# Altium PCB adau1979-fpga.PcbDoc (part 9 of 10)
Units mil, origin at the board's own origin, x right, y up, seen from the top; angles counter-clockwise.
Board outline 7874.02 x 9055.12 mil, 4 copper layers (Top Layer, GND, POWER, Bottom Layer), stack 23.756 mil thick; 636 components, 457 nets, 2015 pads, 4184 vias.
Unrouted connection lines stored in the file: 10.
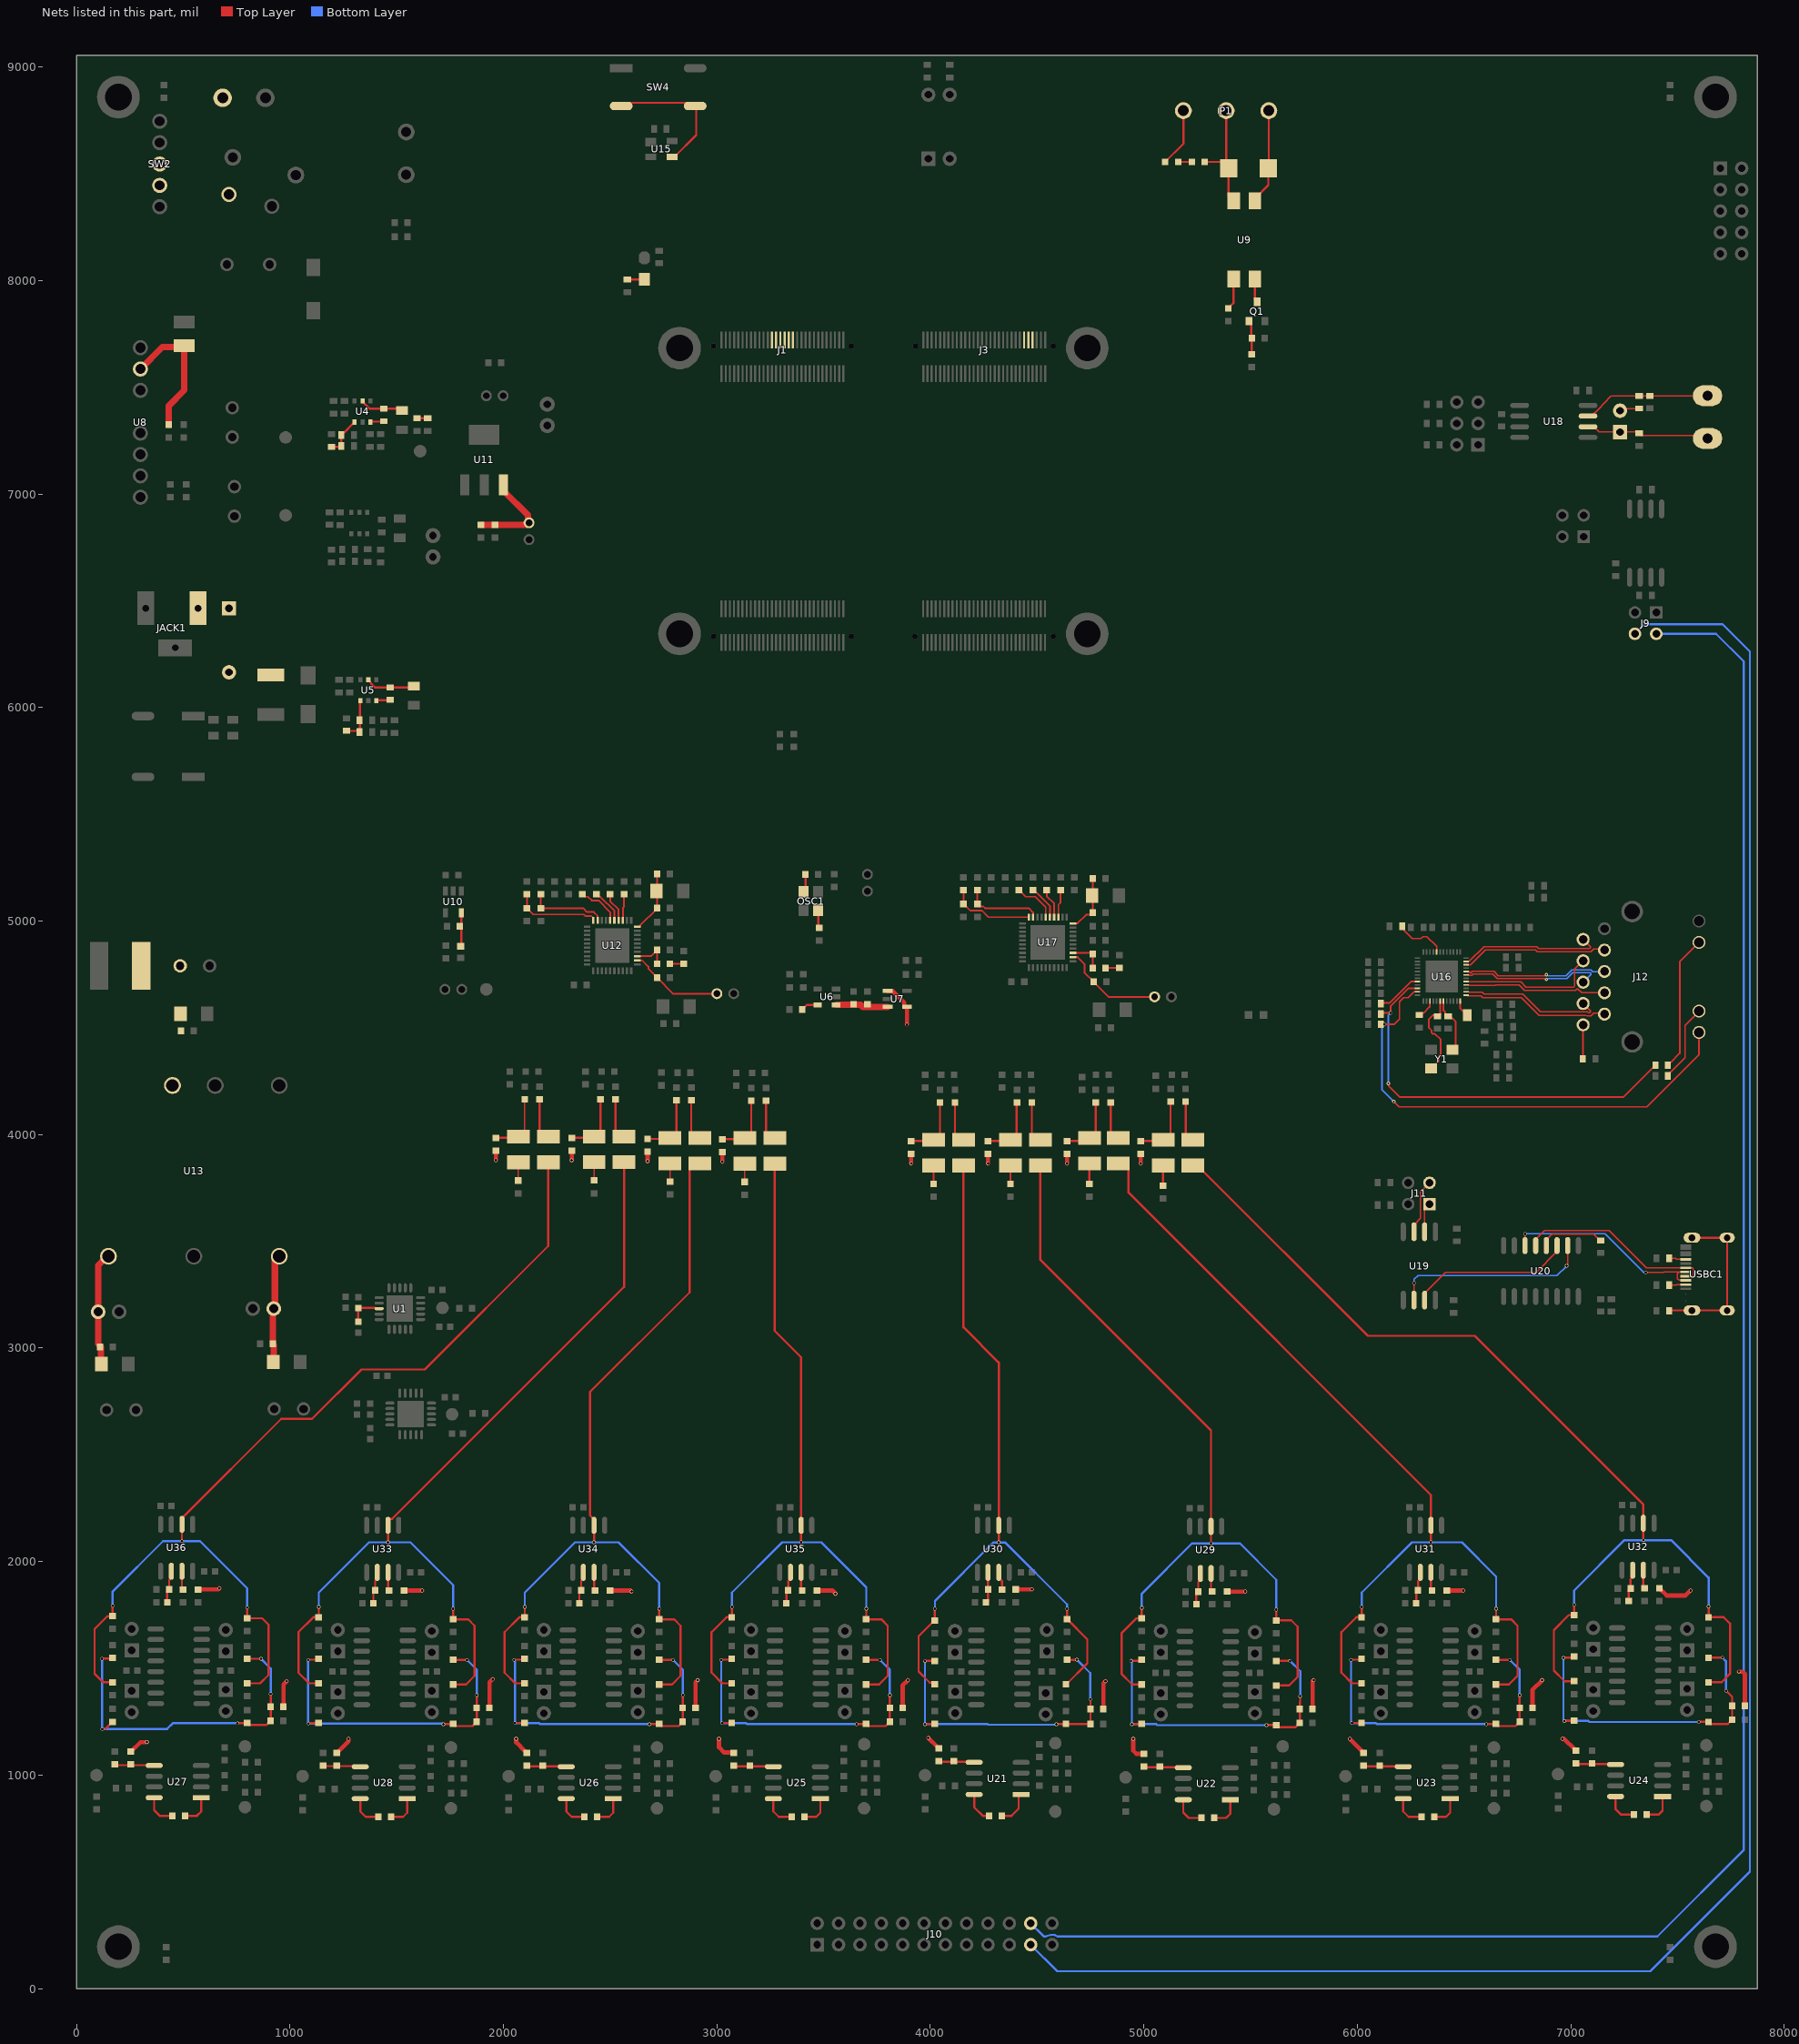
[diagram p8: the nets of this part, all layers, seen from the top]

## Via types
v1: diameter 50, hole 28, Top Layer to Bottom Layer, 3377 vias
v2: diameter 16, hole 12, Top Layer to Bottom Layer, 784 vias
v3: diameter 20, hole 12, Top Layer to Bottom Layer, 14 vias
v4: diameter 16, hole 8, Top Layer to Bottom Layer, 9 vias

## Nets (pads, with @x,y where several pads share a name; then routed paths per layer and width w, separated by ;. In a path a pad name is that pad's centre, name@x,y a point inside that pad or via, vN(x,y) a via of type N, cw(c..) or ccw(c..) an arc to the next point about the centre after c; other vN are vias at no path point) (continued)
NetC18_1: C18.1 L2.1 U4.2 | length 204.6
  Top Layer w10: U4.2@1340,7435 1340,7433.03 1373.03,7400 C18.1@1440,7400 1515.47,7400 L2.1@1525,7390.47
NetC18_2: C18.2 U4.6 | length 64.4
  Top Layer w10: U4.6@1377.4,7336.57 1379.59,7338.76 1437.82,7338.76 C18.2@1440,7340.94
NetC19_1: C19.1 L3.1 U5.2 | length 232.8
  Top Layer w10: U5.2@1367.4,6130 1367.4,6128.03 1379.96,6115.47 1379.96,6111.98 1397.41,6094.53 C19.1@1470,6094.53 1574.53,6094.53 L3.1@1580,6100
NetC19_2: C19.2 U5.6 | length 66.8
  Top Layer w10: U5.6@1404.8,6031.57 1406.75,6033.52 1468.05,6033.52 C19.2@1470,6035.47
NetC28_2: C28.2 R14.2 R17.2 U4.4 | length 184.3
  Top Layer w10: R17.2@1195,7220.94 1235.95,7220.94 C28.2@1240.47,7225.47 R14.2@1240.47,7275.47 ; R14.2@1240.47,7279.41 1249.25,7288.19 1254.21,7288.19 1295.79,7329.76 1297.76,7329.76 1302.6,7334.61 U4.4@1302.6,7336.57
NetC29_2: C29.2 R15.2 R18.2 U5.4 | length 200.8
  Top Layer w10: R18.2@1265,5890.47 1320.94,5890.47 1325.47,5895 1327.74,5897.26 1327.74,6029.31 U5.4@1330,6031.57
NetC30_1: C30.1 U6.5 | length 81.6
  Top Layer w10: C30.1@3399.92,4585 3399.92,4585.79 3421.73,4607.6 U6.5@3471.69,4607.6
NetC37_1: C37.1 L4.2 U8.2 | length 650.5
  Top Layer w30: U8.2@300,7585 402.94,7687.94 498.06,7687.94 L4.2@505,7694.88 505,7485 432.5,7412.5 C37.1@432.5,7324.92
NetC39_2: C39.2 L5.1 U10.5 | length 157.3
  Top Layer w10: L5.1@1800,4882.6 1802.4,4885 U10.5@1802.4,5038.9
NetC51_1: C51.1 R31.2 R32.1 | length 295.2
  Top Layer w6: C51.1@2065.18,3984.92 2066,3984.92 2100,4018.93 R32.1@2100,4165.08
  Top Layer w10: R31.2@1965,3984.92 C51.1@2065.18,3984.92
NetC51_2: C51.2 R28.2 | length 85.3
  Top Layer w6: R28.2@2070,3784.92 C51.2@2070,3870.26
NetC56_1: C56.1 C57.1 R27.2 U11.3 | length 456.7
  Top Layer w30: R27.2@1895,6854.92 2104.19,6854.92 2114.27,6865 C56.1@2120,6865 2115.95,6869.05 2115.95,6900.12 2000.55,7015.51 U11.3@2000.55,7043.07
NetC58_2: C58.2 R33.1 | length 199.4
  Top Layer w10: R33.1@2170,4165.08 2170,4016.93 2197.19,3989.74 C58.2@2210,3989.74
NetC60_2: C60.2 C61.1 L7.1 U13.6 | length 501.2
  Top Layer w30: L7.1@923.99,2936.69 923.99,3015.22 919.92,3019.29 C61.1@919.92,3020 919.92,3180.71 C60.2@924.21,3185 929.61,3190.39 929.61,3424.6 U13.6@935,3430
NetC64_1: C64.1 R38.2 R39.1 | length 293.6
  Top Layer w10: R38.2@2320,3985 2420.18,3985 C64.1@2425,3989.82 ; C64.1@2427.81,3989.82 2455,4017 R39.1@2455,4165.16
NetC64_2: C64.2 R34.2 | length 85.3
  Top Layer w6: R34.2@2425,3785 C64.2@2425,3870.34
NetC65_1: C65.1 C68.2 L9.1 U13.4 | length 525.4
  Top Layer w30: C65.1@101.57,3170 101.57,3388.06 135,3421.48 U13.4@135,3430 ; C65.1@101.57,3170 101.58,3019.21 115.08,3005.71 115.08,3005 115.12,3004.96 115.12,2927.18 L9.1@117.3,2925
NetC69_1: C69.1 C71.1 C72.2 L8.2 U13.3
NetC73_1: C73.1 R43.1 | length 199.4
  Top Layer w10: R43.1@2525,4165.16 2525,4017 2552.18,3989.82 C73.1@2565,3989.82
NetC76_1: C76.1 R51.2 R52.1 | length 293.6
  Top Layer w10: R51.2@2675,3979.92 2775.18,3979.92 C76.1@2780,3984.74 ; C76.1@2782.82,3984.74 2810,4011.93 R52.1@2810,4160.08
NetC76_2: C76.2 R48.2 | length 85.3
  Top Layer w6: R48.2@2780,3779.92 C76.2@2780,3865.26
NetC79_1: C79.1 R55.1 | length 199.4
  Top Layer w10: R55.1@2880,4160.08 2880,4011.93 2907.19,3984.74 C79.1@2920,3984.74
NetC83_1: C83.1 R64.2 R65.1 | length 293.6
  Top Layer w10: R64.2@3025.74,3978.54 3125.92,3978.54 C83.1@3130.74,3983.36 ; C83.1@3133.55,3983.36 3160.74,4010.55 R65.1@3160.74,4158.7
NetC83_2: C83.2 R58.2 | length 85.3
  Top Layer w6: R58.2@3130.74,3778.54 C83.2@3130.74,3863.88
NetC87_1: C87.1 C88.1 U12.2 | length 442.4
  Top Layer w8: U12.2@2628.1,4816.1 2628.2,4816 2649.65,4816 2679.38,4786.27 2679.38,4776.48 2720.08,4735.79 C87.1@2720.08,4735 ; C87.1@2720.08,4734.21 2794.29,4660 C88.1@3000,4660
NetC90_2: C90.2 C96.2 R69.2 U12.10 | length 290.5
  Top Layer w8: U12.10@2628.1,4973.6 2638.35,4973.6 2639.85,4975.1 2639.85,4978.98 2720.08,5059.21 C90.2@2720.08,5060 R69.2@2720.08,5220
NetC95_1: C95.1 C99.1 U12.3 | length 169.6
  Top Layer w8: U12.3@2628.1,4835.8 2691.67,4835.8 2720.08,4864.21 C99.1@2720.08,4865 2720.16,4864.92 C95.1@2720.16,4800
NetC95_2: C95.2 R68.1 | length 65
  Top Layer w8: C95.2@2780,4800 2844.92,4800 R68.1@2845,4800.08
NetC97_1: C97.1 R67.1 | length 199.4
  Top Layer w10: R67.1@3230.74,4158.7 3230.74,4010.55 3257.92,3983.36 C97.1@3270.74,3983.36
NetC101_1: C101.1 R72.2 R73.1 | length 296.4
  Top Layer w10: R72.2@3910,3969.92 4010.18,3969.92 C101.1@4015,3974.74 4017.82,3974.74 4045,4001.93 R73.1@4045,4150.08
NetC101_2: C101.2 R70.2 | length 85.3
  Top Layer w10: R70.2@4015,3769.92 C101.2@4015,3855.26
NetC107_1: C107.1 R76.1 | length 199.4
  Top Layer w10: R76.1@4115,4150.08 4115,4001.93 4142.19,3974.74 C107.1@4155,3974.74
NetC109_1: C109.1 R87.2 R88.1 | length 295.6
  Top Layer w10: R87.2@4270,3969.92 4370.18,3969.92 C109.1@4375,3974.74 4377.03,3974.74 4404.21,4001.93 R88.1@4404.21,4150.08
NetC109_2: C109.2 R80.2 | length 85.3
  Top Layer w10: R80.2@4375,3769.92 C109.2@4375,3855.26
NetC114_1: C114.1 R92.1 | length 199.4
  Top Layer w10: R92.1@4475,4150.08 4475,4001.93 4502.19,3974.74 C114.1@4515,3974.74
NetC117_1: C117.1 R104.2 R105.1 | length 286.9
  Top Layer w10: R104.2@4640.79,3969.92 4730.18,3969.92 C117.1@4745,3984.74 ; C117.1@4747.82,3984.74 4775,4011.93 R105.1@4775,4150.08
NetC117_2: C117.2 R98.2 | length 95.3
  Top Layer w10: R98.2@4745,3769.92 C117.2@4745,3865.26
NetC122_1: C122.1 R107.1 | length 184.4
  Top Layer w10: R107.1@4845,4150.08 4845,4011.93 4872.19,3984.74 C122.1@4880,3984.74
NetC124_1: C124.1 R112.2 R113.1 | length 306.4
  Top Layer w10: R112.2@4985,3969.92 5085.1,3969.92 C124.1@5090,3974.82 5097.82,3974.82 5125,4002 R113.1@5125,4155.08
NetC124_2: C124.2 R108.2 | length 95.4
  Top Layer w10: R108.2@5090,3759.92 C124.2@5090,3855.34
NetC125_2: C125.2 C135.2 R123.2 U17.10 | length 273.3
  Top Layer w8: U17.10@4668.1,4988.6 4668.96,4989.46 4689.46,4989.46 4729.2,5029.2 4749.28,5029.2 C125.2@4760.08,5040 4760.08,5120 R123.2@4760.08,5200
NetC126_1: C126.1 C131.1 U17.2 | length 483.2
  Top Layer w8: U17.2@4668.1,4831.1 4668.2,4831 4689.65,4831 4721.88,4798.77 4721.88,4758.98 4765.08,4715.79 C126.1@4765.08,4715 4765.08,4714.21 4834.29,4645 C131.1@5050,4645
NetC127_2: C127.2 J12.1 | length 159.6
  Top Layer w8: C127.2@7055.47,4355 7057.09,4356.61 J12.1@7057.09,4513.98
NetC128_2: C128.2 U20.4 | length 305.1
  Top Layer w6: U20.4@6885,3480 6885,3508 6910,3533 7107.59,3533 7136.06,3504.53 C128.2@7140,3504.53
NetC132_2: C132.2 U16.42 Y1.3 | length 397.2
  Top Layer w8: Y1.3@6345,4310 6348.94,4310 6369.56,4330.62 6369.56,4334.56 6381.56,4346.56 6381.56,4367.85 6390,4376.29 6390,4445 6363.31,4471.69 6353.14,4471.69 6347.28,4477.55 6347.28,4487.72 6335,4500 6335,4540.27 6354.47,4559.75 C132.2@6365.52,4559.75 ; C132.2@6375,4554.53 6378.22,4554.53 6388,4564.31 6388,4607.46 6387.13,4608.33 U16.42@6387.13,4625.53
NetC133_2: C133.2 U16.43 Y1.1 | length 269.9
  Top Layer w8: U16.43@6402.87,4625.53 6402.87,4580.59 6411.28,4572.18 6411.28,4564.31 6417.44,4558.15 C133.2@6425.32,4558.15 ; C133.2@6425,4554.53 6435.47,4554.53 6435.47,4547.99 6438.72,4544.75 6445.25,4544.75 6460,4530 6460,4411.61 Y1.1@6445,4396.61
NetC134_1: C134.1 C136.1 U17.3 | length 159.4
  Top Layer w8: U17.3@4668.1,4850.8 4754.28,4850.8 C136.1@4760.08,4845 4760.08,4780.08 C134.1@4760.16,4780
NetC134_2: C134.2 R119.1 | length 65
  Top Layer w8: C134.2@4820,4780 4884.92,4780 R119.1@4885,4780.08
NetC137_1: C137.1 R122.1 | length 198.5
  Top Layer w10: R122.1@5195.79,4155.08 5195.79,4002 5222.97,3974.82 C137.1@5230,3974.82
NetC172_1: C172.1 R229.1 U29.2 | length 152
  Top Layer w10: C172.1@5245.59,1800 5245.59,1851.26 R229.1@5254.33,1860 ; R229.1@5254.33,1860.78 5254.33,1904.14 5264.41,1914.22 U29.2@5264.41,1945
NetC173_1: C173.1 R231.1 U30.2 | length 141.6
  Top Layer w10: C173.1@4266.18,1810 4270,1813.82 4270,1870 U30.2@4270,1950
NetC174_1: C174.1 R238.1 U31.2 | length 152
  Top Layer w10: C174.1@6275.59,1805 6275.59,1856.26 R238.1@6284.33,1865 ; R238.1@6284.33,1865.78 6284.33,1909.14 6294.41,1919.22 U31.2@6294.41,1950
NetC175_1: C175.1 R239.1 U32.2 | length 152
  Top Layer w10: C175.1@7270.59,1815 7270.59,1866.26 R239.1@7279.33,1875 ; R239.1@7279.33,1875.78 7279.33,1919.14 7289.41,1929.22 U32.2@7289.41,1960
NetC176_1: C176.1 R240.1 U33.2 | length 152
  Top Layer w10: C176.1@1390.59,1805 1390.59,1856.26 R240.1@1399.33,1865 ; R240.1@1399.33,1865.78 1399.33,1909.14 1409.41,1919.22 U33.2@1409.41,1950
NetC177_1: C177.1 R241.1 U34.2 | length 152
  Top Layer w10: C177.1@2355.59,1805 2355.59,1856.26 R241.1@2364.33,1865 ; R241.1@2364.33,1865.78 2364.33,1909.14 2374.41,1919.22 U34.2@2374.41,1950
NetC178_1: C178.1 R242.1 U35.2 | length 152
  Top Layer w10: C178.1@3325.59,1805 3325.59,1856.26 R242.1@3334.33,1865 ; R242.1@3334.33,1865.78 3334.33,1909.14 3344.41,1919.22 U35.2@3344.41,1950
NetC179_1: C179.1 R245.1 U36.2 | length 152
  Top Layer w10: C179.1@425.59,1810 425.59,1861.26 R245.1@434.33,1870 ; R245.1@434.33,1870.78 434.33,1914.14 444.41,1924.22 U36.2@444.41,1955
NetCON1_1: CON1.1 J13.1 R77.1 U18.6 | length 582.8
  Top Layer w6: U18.6@7080,7315 7107.13,7315 7132.13,7290 7314.53,7290 R77.1@7320,7284.53 7330.78,7273.75 7626.25,7273.75 CON1.1@7640,7260
NetCON1_2: CON1.2 R84.2 R106.1 U18.7 | length 599.4
  Top Layer w6: U18.7@7080,7365 7095,7365 7129.02,7396.69 ccw(c7112,7415) 7130.03,7397.69 7186.49,7456.49 7190,7460 7320,7460 R106.1@7370,7460 CON1.2@7640,7460
NetF1_1: F1.1 SW1.2
NetF2_1: F2.1 SW2.3
NetJ9_2: J9.2 J10.22 | length 9564.4
  Bottom Layer w10: J10.22@4470,306 4528.07,247.93 4531,245 4539.28,245 4555.85,250.29 cw(c4570,206) 4595.32,245 7405,245 7810,650 7810,6215 7680,6345 J9.2@7400,6345
NetJ9_4: J9.4 J10.21 | length 9935.8
  Bottom Layer w10: J10.21@4470,206 4594.15,81.85 7371.85,81.85 7838,548 7838,6262 7710.47,6389.53 7344.53,6389.53 J9.4@7300,6345
NetJ12_12: J12.12 R93.2 | length 363.6
  Top Layer w8: R93.2@7454.53,4275 7454.53,4278.94 7535,4359.41 7535,4512.01 7600,4577.01 J12.12@7600,4578.35
NetJ12_13: J12.13 R101.2 | length 637.6
  Top Layer w8: R101.2@7454.53,4325 7454.53,4328.94 7464.31,4338.72 7468.24,4338.72 7510,4380.47 7510,4810 J12.13@7600,4900
NetJ13_2: J13.2 R84.1 | length 94.3
  Top Layer w6: J13.2@7230,7390 7240.47,7400.47 R84.1@7320,7400.47
NetJACK1_1: JACK1.1 SW1.1
NetL10_1: L10.1 U16.48 | length 75.2
  Top Layer w8: U16.48@6481.61,4625.53 6481.61,4590.89 6505,4567.5 L10.1@6505,4560
NetLED1_1: LED1.1 R13.1 | length 50
  Top Layer w10: R13.1@1595,7355 LED1.1@1645,7355
NetLED2_1: LED2.1 R46.2 | length 80.2
  Top Layer w10: R46.2@2580,8004.53 2659.53,8004.53 LED2.1@2660,8005
NetOSC1_1: OSC1.1 R26.1 | length 85.7
  Top Layer w10: OSC1.1@3405.5,5137.04 3415.08,5146.62 R26.1@3415.08,5218.74
NetOSC1_3: OSC1.3 R30.1 | length 84.1
  Top Layer w10: OSC1.3@3474.4,5050.44 3474.4,4974.26 R30.1@3480,4968.66
NetP2_2: P2.2 SW2.2
NetQ1_1: Q1.1 R21.2 R22.2 | length 159.9
  Top Layer w10: Q1.1@5492.6,7809.73 5503.35,7798.98 5503.35,7730.79 5505,7729.13 R21.2@5505,7654.92
NetQ1_3: Q1.3 U9.2 | length 110.8
  Top Layer w10: U9.2@5520,8006.93 5520,7910.27 Q1.3@5530,7900.27
NetR2_1: R2.1 R4.2 U1.3 | length 162.8
  Top Layer w10: R4.2@1320,3123.46 R2.1@1320,3187.28 ; R2.1@1320,3187.89 1399.53,3187.89 1402.42,3185 U1.3@1417.82,3185
NetR16_2: R16.2 R20.1 | length 65.2
  Top Layer w10: R16.2@5159.92,8555 R20.1@5225.08,8555
NetR19_2: R19.2 U9.1 | length 147.8
  Top Layer w10: R19.2@5395,7869.92 5395.79,7869.92 5420,7894.13 U9.1@5420,8006.93
NetR36_2: R36.2 R53.1 U12.20 | length 405.3
  Top Layer w8: R53.1@2110,5059.92 R36.2@2110,5125.08 ; R53.1@2110.79,5059.92 2139.75,5030.96 2376.79,5030.96 2383.63,5024.12 2410.73,5024.12 2419.9,5014.95 2419.9,5004.7 U12.20@2421.4,5003.2
NetR37_2: R37.2 R54.2 U12.19 | length 367.3
  Top Layer w8: R37.2@2175,5125.08 R54.2@2175,5059.92 2373.28,5059.92 2391.09,5042.12 2423.53,5042.12 2440.9,5024.75 2440.9,5003.4 U12.19@2441.1,5003.2
NetR42_1: R42.1 U12.16 | length 203.4
  Top Layer w8: R42.1@2370,5125.08 2380.96,5114.12 2395.45,5114.12 2413.45,5096.12 2445.9,5096.12 2500.3,5041.72 2500.3,5003.4 U12.16@2500.1,5003.2
NetR44_1: R44.1 U12.15 | length 161.3
  Top Layer w8: R44.1@2435,5125.08 2445.96,5114.12 2453.35,5114.12 2519.8,5047.67 U12.15@2519.8,5003.2
NetR47_1: R47.1 U12.14 | length 138.2
  Top Layer w8: R47.1@2500,5125.08 2500,5092.93 2539.5,5053.43 U12.14@2539.5,5003.2
NetR49_1: R49.1 U12.13 | length 124.2
  Top Layer w8: U12.13@2559.2,5003.2 2559.4,5003.4 2559.4,5061.69 2565,5067.29 R49.1@2565,5125
NetR78_2: R78.2 R102.1 U17.20 | length 396.3
  Top Layer w8: R102.1@4155,5079.92 R78.2@4155,5145.08 ; R102.1@4155.79,5079.92 4186.67,5049.04 4241.55,5049.04 4272.39,5018.2 U17.20@4461.4,5018.2
NetR79_2: R79.2 R103.2 U17.19 | length 363.5
  Top Layer w8: R103.2@4220,5079.92 R79.2@4220,5145.08 ; R103.2@4220.79,5079.92 4231.75,5068.96 4247.08,5068.96 4256.04,5060 4460.65,5060 4480.9,5039.75 4480.9,5018.4 U17.19@4481.1,5018.2
NetR89_1: R89.1 U17.16 | length 205.5
  Top Layer w8: R89.1@4415,5145.08 4415.79,5145.08 4446.87,5114 4491.91,5114 4540,5065.91 4540,5018.3 U17.16@4540.1,5018.2
NetR91_1: R91.1 U17.15 | length 163.6
  Top Layer w8: R91.1@4480,5145.08 4480.79,5145.08 4491.75,5134.12 4497.25,5134.12 4559.8,5071.57 U17.15@4559.8,5018.2
NetR94_1: R94.1 U17.14 | length 141.2
  Top Layer w8: R94.1@4545,5145.08 4545,5116.65 4579.5,5082.15 U17.14@4579.5,5018.2
NetR95_2: R95.2 USBC1.1 USBC1.2 USBC1.3 USBC1.4 | length 778.1
  Top Layer w10: R95.2@7459.53,3175 7461.02,3176.49 USBC1.3@7731.85,3176.49 USBC1.2@7731.85,3517.05 USBC1.1@7567.29,3517.05
NetR96_1: R96.1 U16.20 | length 236.3
  Top Layer w6: R96.1@6209.53,4970 6209.53,4966.06 6227.17,4948.43 6227.17,4948.14 6257.31,4918 6297.98,4918 6307.54,4927.56 6325.87,4927.56 6371.38,4882.05 U16.20@6371.38,4854.47
NetR97_1: R97.1 U17.13 | length 131.3
  Top Layer w8: U17.13@4599.2,5018.2 4599.4,5018.4 4599.4,5076.69 4610,5087.29 R97.1@4610,5145
NetR110_1: R110.1 U16.39 | length 78.4
  Top Layer w8: R110.1@6300,4569.53 6309.98,4569.53 6338,4597.54 6338,4603.25 6339.82,4605.07 6339.82,4625.47 U16.39@6339.88,4625.53
NetR114_1: R114.1 U16.32 | length 213.7
  Top Layer w8: R114.1@6109.53,4613.33 6113.46,4617.27 6152.22,4617.27 6251.33,4716.38 U16.32@6280.53,4716.38
NetR120_1: R120.1 USBC1.A5 | length 78.6
  Top Layer w6: R120.1@7459.53,3295 7491.49,3295 7494.05,3297.56 USBC1.A5@7537.04,3297.56
NetR121_1: R121.1 USBC1.B5 | length 79.3
  Top Layer w6: R121.1@7459.53,3420 7490.61,3420 7494.94,3415.67 USBC1.B5@7537.04,3415.67
NetR133_2: R133.2 R135.2 U21.5 | length 167.1
  Top Layer w10: R135.2@4040,1065.08 4042.54,1062.54 4202.46,1062.54 U21.5@4205,1060
NetR136_2: R136.2 R139.2 U22.5 | length 187.1
  Top Layer w10: R139.2@4999.41,1040.08 5002.76,1036.72 5182.68,1036.72 U22.5@5184.41,1035
NetR137_2: R137.2 R141.2 U23.5 | length 187.1
  Top Layer w10: R141.2@6029.41,1045.08 6032.76,1041.72 6212.68,1041.72 U23.5@6214.41,1040
NetR142_2: R142.2 R150.2 U24.5 | length 187.1
  Top Layer w10: R150.2@7024.41,1055.08 7027.76,1051.72 7207.68,1051.72 U24.5@7209.41,1050
NetR143_2: R143.2 R148.2 U26.5 | length 187.1
  Top Layer w10: R148.2@2109.41,1045.08 2112.76,1041.72 2292.68,1041.72 U26.5@2294.41,1040
NetR144_2: R144.2 R152.2 U25.5 | length 187.1
  Top Layer w10: R152.2@3079.41,1045.08 3082.76,1041.72 3262.68,1041.72 U25.5@3264.41,1040
NetR146_2: R146.2 R154.2 U28.5 | length 176.5
  Top Layer w10: R146.2@1155,1045.08 1157.54,1042.54 1326.87,1042.54 U28.5@1329.41,1040
NetR151_2: R151.2 R155.2 U27.5 | length 187.1
  Top Layer w10: R155.2@179.41,1050.08 182.76,1046.72 362.68,1046.72 U27.5@364.41,1045
NetR157_1: R157.1 R173.1 R187.1 R193.1 R206.1 R218.2 | length 1580
  Top Layer w10: v2(4940,1535) 4941.15,1536.15 4985.48,1536.15 R173.1@4989.41,1540.08 ; v2@4945.08,1240.08 R157.1@4989.41,1240.08 ; v2@5575.08,1235.08 R187.1@5619.41,1235.08 5629.37,1225.11 5635.9,1225.11 5636.01,1225 5710.08,1225 5719.33,1234.25 5720.12,1234.25 5730.08,1244.21 R193.1@5730.08,1310 5730.04,1310.04 5730.04,1342 5732,1343.96 v2(5732,1370) ; R206.1@5619.41,1535.15 v2(5684.25,1535.15)
  Bottom Layer w10: v2(4940,1535) 4940,1540 4943.93,1536.07 v2(4943.93,1238.93) 5056.94,1238.93 5061.94,1233.93 v2(5573.93,1233.93) ; v2(5684.25,1535.15) 5733,1486.4 5733,1371 v2(5732,1370)
NetR159_1: R159.1 R175.1 R191.1 R204.1 R214.1 R228.2 | length 1530.8
  Top Layer w10: v2@3975.67,1240.08 R159.1@4020,1240.08 ; v2@3975.67,1535.08 R175.1@4020,1535.08 ; v2@4590.67,1240.08 R191.1@4635,1240.08 4750,1240.08 R228.2@4750.08,1240 R204.1@4750.08,1310 v2@4750.08,1354.33 ; R214.1@4640,1540.08 v2@4684.33,1540.08
  Bottom Layer w10: v2(3974.52,1533.93) v2(3974.52,1238.93) 4266.91,1238.93 4269.31,1236.54 4585.5,1236.54 4587.9,1238.93 v2(4589.52,1238.93) ; v2(4685.48,1541.23) 4748.93,1477.78 v2(4748.93,1355.48)
NetR161_1: R161.1 R177.1 R194.1 R205.1 R216.1 R230.2 | length 1567.5
  Top Layer w10: v2(5970,1540) 5971.15,1541.15 6015.48,1541.15 R177.1@6019.41,1545.08 ; v2@5975.08,1245.08 R161.1@6019.41,1245.08 ; v2@6605.08,1240.08 R194.1@6649.41,1240.08 6659.37,1230.11 6665.9,1230.11 6666.01,1230 6740.08,1230 6749.33,1239.25 6750.12,1239.25 6760.08,1249.21 R205.1@6760.08,1315 6760.04,1315.04 v2(6760,1375) v2(6760,1375) ; R216.1@6649.41,1540.15 v2(6714.25,1540.15)
  Bottom Layer w10: v2(5970,1540) 5970,1249.48 5973.93,1245.55 v2(5973.93,1243.93) 6086.94,1243.93 6091.94,1238.93 v2(6603.93,1238.93) ; v2(6714.25,1540.15) 6760,1494.4 v2(6760,1375)
NetR163_1: R163.1 R179.1 R196.1 R208.2 R219.1 R232.2 | length 1567.5
  Top Layer w10: v2(6965,1550) 6966.15,1551.15 7010.48,1551.15 R179.1@7014.41,1555.08 ; v2@6970.08,1255.08 R163.1@7014.41,1255.08 ; v2@7600.08,1250.08 R196.1@7644.41,1250.08 7654.37,1240.11 7660.9,1240.11 7661.01,1240 7735.08,1240 7744.33,1249.25 7745.12,1249.25 7755.08,1259.21 R208.2@7755.08,1325 7755.04,1325.04 7755.04,1367 v2(7727,1395) ; R219.1@7644.41,1550.15 v2(7709.25,1550.15)
  Bottom Layer w10: v2(6965,1550) 6965,1259.48 6968.93,1255.55 v2(6968.93,1253.93) 7081.94,1253.93 7086.94,1248.93 v2(7598.93,1248.93) ; v2(7709.25,1550.15) 7727,1532.4 v2(7727,1395)
NetR165_1: R165.1 R181.1 R198.1 R211.1 R222.1 R235.2 | length 1569.8
  Top Layer w10: v2(1085,1540) 1086.15,1541.15 1130.48,1541.15 R181.1@1134.41,1545.08 ; v2@1088.11,1243.11 R165.1@1132.44,1243.11 ; v2@1720.08,1240.08 R198.1@1764.41,1240.08 1774.37,1230.11 1780.9,1230.11 1781.01,1230 1855.08,1230 1864.33,1239.25 1865.12,1239.25 1875.08,1249.21 R211.1@1875.08,1315 1875.04,1315.04 v2(1875,1375) v2(1875,1375) ; R222.1@1764.41,1540.15 v2(1829.25,1540.15)
  Bottom Layer w10: v2(1085,1540) 1085,1245.55 1086.96,1243.59 v2(1086.96,1241.96) 1087.4,1241.53 1714.7,1241.53 1717.3,1238.93 v2(1718.93,1238.93) ; v2(1829.25,1540.15) 1875,1494.4 v2(1875,1375)
NetR167_1: R167.1 R183.1 R200.1 R212.1 R224.1 R236.2 | length 1567.5
  Top Layer w10: v2(2050,1540) 2051.15,1541.15 2095.48,1541.15 R183.1@2099.41,1545.08 ; v2@2055.08,1245.08 R167.1@2099.41,1245.08 ; v2@2685.08,1240.08 R200.1@2729.41,1240.08 2739.37,1230.11 2745.9,1230.11 2746.01,1230 2820.08,1230 2829.33,1239.25 2830.12,1239.25 2840.08,1249.21 R212.1@2840.08,1315 2840.04,1315.04 v2(2840,1375) v2(2840,1375) ; R224.1@2729.41,1540.15 v2(2794.25,1540.15)
  Bottom Layer w10: v2(2050,1540) 2050,1538.38 2053.93,1534.45 v2(2053.93,1243.93) 2166.94,1243.93 2171.94,1238.93 v2(2683.93,1238.93) ; v2(2794.25,1540.15) 2840,1494.4 v2(2840,1375)
NetR169_1: R169.1 R185.1 R202.1 R213.1 R226.1 R237.2 | length 1567.5
  Top Layer w10: v2(3020,1540) 3021.15,1541.15 3065.48,1541.15 R185.1@3069.41,1545.08 ; v2@3025.08,1245.08 R169.1@3069.41,1245.08 ; v2@3655.08,1240.08 R202.1@3699.41,1240.08 3709.37,1230.11 3715.9,1230.11 3716.01,1230 3790.08,1230 3799.33,1239.25 3800.12,1239.25 3810.08,1249.21 R213.1@3810.08,1315 3810.04,1315.04 v2(3810,1375) v2(3810,1375) ; R226.1@3699.41,1540.15 v2(3764.25,1540.15)
  Bottom Layer w10: v2(3020,1540) 3020,1249.48 3023.93,1245.55 v2(3023.93,1243.93) 3136.94,1243.93 3141.94,1238.93 v2(3653.93,1238.93) ; v2(3764.25,1540.15) 3810,1494.4 v2(3810,1375)
NetR171_1: R171.1 R189.1 R209.1 R221.1 R233.1 R243.2 | length 1629.7
  Top Layer w10: v2(120,1545) 121.15,1546.15 165.48,1546.15 R189.1@169.41,1550.08 ; v2(121.15,1216.15) 122.3,1217.3 135.84,1217.3 168.62,1250.08 R171.1@169.41,1250.08 ; v2@755.67,1244.48 R209.1@800,1244.48 ; R209.1@799.41,1245.08 R209.1@800,1244.48 ; R233.1@799.41,1545.15 v2(864.25,1545.15) ; v2(910,1380) v2(910,1380) 910.04,1320.04 R221.1@910.08,1320 910.08,1254.21 900.12,1244.25 899.33,1244.25 890.08,1235 816.01,1235 815.9,1235.11 809.37,1235.11 R209.1@800,1244.48
  Bottom Layer w10: v2(120,1545) 120.57,1544.43 120.57,1216.72 v2(121.15,1216.15) 424.24,1216.15 451.43,1243.33 v2(754.52,1243.33) ; v2(864.25,1545.15) 910,1499.4 v2(910,1380)
NetR244_2: R244.2 U29.3 | length 87.1
  Top Layer w10: U29.3@5314.41,1945 5314.41,1864.92 R244.2@5319.41,1859.92
NetR246_2: R246.2 U30.3 | length 86.3
  Top Layer w10: U30.3@4320,1950 4320,1924.14 4335,1909.14 R246.2@4335,1869.92
NetR247_2: R247.2 U31.3 | length 87.1
  Top Layer w10: U31.3@6344.41,1950 6344.41,1869.92 R247.2@6349.41,1864.92
NetR250_2: R250.2 U32.3 | length 87.1
  Top Layer w10: U32.3@7339.41,1960 7339.41,1879.92 R250.2@7344.41,1874.92
NetR251_2: R251.2 U33.3 | length 87.1
  Top Layer w10: U33.3@1459.41,1950 1459.41,1869.92 R251.2@1464.41,1864.92
NetR252_2: R252.2 U34.3 | length 87.1
  Top Layer w10: U34.3@2424.41,1950 2424.41,1869.92 R252.2@2429.41,1864.92
NetR253_2: R253.2 U35.3 | length 87.1
  Top Layer w10: U35.3@3394.41,1950 3394.41,1869.92 R253.2@3399.41,1864.92
NetR260_2: R260.2 U36.3 | length 87.1
  Top Layer w10: U36.3@494.41,1955 494.41,1874.92 R260.2@499.41,1869.92
NetRg1_1: Rg1.1 U21.1 | length 166.7
  Top Layer w10: Rg1.1@4334.92,810 4380,810 4412.99,842.99 4412.99,903 4419.99,910 U21.1@4425,910
NetRg1_2: Rg1.2 U21.8 | length 146.6
  Top Layer w10: U21.8@4205,910 4205,850 4245,810 Rg1.2@4275.08,810
NetRg2_1: Rg2.1 U22.1 | length 148.7
  Top Layer w10: Rg2.1@5329.33,800 5385,800 5404.41,819.41 U22.1@5404.41,885
NetRg2_2: Rg2.2 U22.8 | length 155.1
  Top Layer w10: U22.8@5184.41,885 5184.41,825.59 5210,800 Rg2.2@5269.48,800
NetRg3_1: Rg3.1 U23.1 | length 148.7
  Top Layer w10: Rg3.1@6359.33,805 6415,805 6434.41,824.41 U23.1@6434.41,890
NetRg3_2: Rg3.2 U23.8 | length 155.1
  Top Layer w10: U23.8@6214.41,890 6214.41,830.59 6240,805 Rg3.2@6299.48,805
NetRg4_1: Rg4.1 U24.1 | length 148.7
  Top Layer w10: Rg4.1@7354.33,815 7410,815 7429.41,834.41 U24.1@7429.41,900
NetRg4_2: Rg4.2 U24.8 | length 155.1
  Top Layer w10: U24.8@7209.41,900 7209.41,840.59 7235,815 Rg4.2@7294.48,815
NetRg5_1: Rg5.1 U26.1 | length 148.7
  Top Layer w10: Rg5.1@2439.33,805 2495,805 2514.41,824.41 U26.1@2514.41,890
NetRg5_2: Rg5.2 U26.8 | length 155.1
  Top Layer w10: U26.8@2294.41,890 2294.41,830.59 2320,805 Rg5.2@2379.48,805
NetRg6_1: Rg6.1 U25.1 | length 148.7
  Top Layer w10: Rg6.1@3409.33,805 3465,805 3484.41,824.41 U25.1@3484.41,890
NetRg6_2: Rg6.2 U25.8 | length 155.1
  Top Layer w10: U25.8@3264.41,890 3264.41,830.59 3290,805 Rg6.2@3349.48,805
NetRg7_1: Rg7.1 U27.1 | length 148.7
  Top Layer w10: Rg7.1@509.33,810 565,810 584.41,829.41 U27.1@584.41,895
NetRg7_2: Rg7.2 U27.8 | length 155.1
  Top Layer w10: U27.8@364.41,895 364.41,835.59 390,810 Rg7.2@449.48,810
NetRg8_1: Rg8.1 U28.1 | length 148.7
  Top Layer w10: Rg8.1@1474.33,805 1530,805 1549.41,824.41 U28.1@1549.41,890
NetRg8_2: Rg8.2 U28.8 | length 155.1
  Top Layer w10: U28.8@1329.41,890 1329.41,830.59 1355,805 Rg8.2@1414.48,805
NetSW4_2: SW4.2 SW4.3 U15.3 | length 653.5
  Top Layer w10: SW4.2@2556.77,8831.83 2903.23,8831.83 2903.23,8680.73 2800,8577.5 U15.3@2790,8577.5
NetU20_5: U20.5 USBC1.A6 USBC1.B6 | length 926.1
  Top Layer w6: U20.5@6835,3480 6835,3508 6877,3550 7180,3550 7353.7,3376.3 USBC1.B6@7537.04,3376.3 7537.82,3375.52 7568.02,3375.52 7575.63,3367.9 7575.63,3345.32 7568.02,3337.7 7537.81,3337.7 USBC1.A6@7537.04,3336.93
NetU20_6: U20.6 USBC1.A7 USBC1.B7 | length 985.7
  Top Layer w6: U20.6@6785,3452 U20.6@6785,3480 v2(6785,3535) ; v2(7350,3355) 7434.12,3355 7435.73,3356.61 USBC1.A7@7537.04,3356.61 ; 7506.06,3355.84 7498.45,3348.22 7498.45,3325.64 7506.06,3318.02 7536.26,3318.02 USBC1.B7@7537.04,3317.24
  Bottom Layer w6: v2(6785,3535) 7160,3535 7340,3355 v2(7350,3355)
OUT1_P: C58.1 R172.2 R190.2 R210.2 R234.2 U36.6 | length 4703.3
  Top Layer w10: R172.2@169.41,1434.92 125.08,1434.92 85,1475 85,1685 144.52,1744.52 169,1744.52 R190.2@169.41,1744.92 170,1745.51 v2(170,1793.31) ; v2(494.41,2095.59) U36.6@494.41,2175 494.41,2203 959.91,2668.5 1103.5,2668.5 1335,2900 1631.77,2900 2210,3478.23 C58.1@2210,3870.26 ; R210.2@799.41,1429.92 859.92,1429.92 900,1470 900,1705 870.08,1734.92 R234.2@799.41,1734.92 800,1735.51 v2(800,1785)
  Bottom Layer w10: v2(170,1793.31) 170,1860 405.59,2095.59 v2(494.41,2095.59) 579.41,2095.59 800,1875 v2(800,1785)
OUT2_P: C73.2 R166.2 R182.2 R199.2 R223.2 U33.6 | length 4225.7
  Top Layer w10: R166.2@1134.41,1429.92 1090.08,1429.92 1040,1480 1040,1670 1109.52,1739.52 1134,1739.52 R182.2@1134.41,1739.92 1135,1740.51 v2(1135,1788.31) ; v2(1459.41,2090.59) U33.6@1459.41,2170 1459.41,2194.21 1465.87,2200.68 1479.56,2200.68 2565,3286.12 C73.2@2565,3870.34 ; R199.2@1764.41,1424.92 1824.92,1424.92 1865,1465 1865,1700 1835.08,1729.92 R223.2@1764.41,1729.92 1765,1730.51 v2(1765,1780)
  Bottom Layer w10: v2(1135,1788.31) 1135,1855 1370.59,2090.59 v2(1459.41,2090.59) 1564.41,2090.59 1765,1890 v2(1765,1780)
OUT3_P: C79.2 R168.2 R184.2 R201.2 R225.2 U34.6 | length 3965.9
  Top Layer w10: R168.2@2099.41,1429.92 2055.08,1429.92 2005,1480 2005,1670 2074.52,1739.52 2099,1739.52 R184.2@2099.41,1739.92 2100,1740.51 v2(2100,1788.31) ; v2(2424.41,2090.59) U34.6@2424.41,2170 ; U34.6@2424.41,2198 2405.31,2217.09 2405.31,2794.31 2871.85,3260.85 2871.85,3838.07 2899.04,3865.26 C79.2@2920,3865.26 ; R201.2@2729.41,1424.92 2789.92,1424.92 2830,1465 2830,1700 2800.08,1729.92 R225.2@2729.41,1729.92 2730,1730.51 v2(2730,1780)
  Bottom Layer w10: v2(2100,1788.31) 2100,1855 2335.59,2090.59 v2(2424.41,2090.59) 2539.41,2090.59 2730,1900 v2(2730,1780)
OUT4_P: C97.2 R170.2 R186.2 R203.2 R227.2 U35.6 | length 3798.7
  Top Layer w10: R170.2@3069.41,1429.92 3025.08,1429.92 2975,1480 2975,1670 3044.52,1739.52 3069,1739.52 R186.2@3069.41,1739.92 3070,1740.51 v2(3070,1788.31) ; C97.2@3270.74,3863.88 3270.74,3081.07 3394.41,2957.41 U35.6@3394.41,2170 v2(3394.41,2090.59) ; R203.2@3699.41,1424.92 3759.92,1424.92 3800,1465 3800,1700 3770.08,1729.92 R227.2@3699.41,1729.92 3700,1730.51 v2(3700,1780)
  Bottom Layer w10: v2(3070,1788.31) 3070,1855 3305.59,2090.59 v2(3394.41,2090.59) 3489.41,2090.59 3700,1880 v2(3700,1780)
OUT5_P: C107.2 R160.2 R176.2 R192.2 R215.2 U30.6 | length 3605.8
  Top Layer w10: R160.2@4020,1424.92 4011.5,1433.42 3996.58,1433.42 3945,1485 3945,1650.63 4019.21,1724.84 R176.2@4020,1724.84 v2(4020,1780) ; C107.2@4155,3855.26 4155,3097.43 4320,2932.43 U30.6@4320,2170 v2(4320,2090) ; R192.2@4635,1424.92 4635.79,1424.92 4735,1524.13 4735,1635.71 4640.79,1729.92 R215.2@4640,1729.92 v2(4640,1780)
  Bottom Layer w10: v2(4020,1780) 4021.15,1781.15 4021.15,1816.15 4295,2090 v2(4320,2090) 4350,2090 4640,1800 v2(4640,1780)
OUT6_P: C114.2 R158.2 R174.2 R188.2 R207.2 U29.6 | length 4098.4
  Top Layer w10: C114.2@4515,3855.26 4515,3413.47 5314.41,2614.07 U29.6@5314.41,2165 v2(5314.41,2085.59) ; R158.2@4989.41,1424.92 4945.08,1424.92 4895,1475 4895,1665 4964.52,1734.52 4989,1734.52 R174.2@4989.41,1734.92 4990,1735.51 v2(4990,1783.31) ; R188.2@5619.41,1419.92 5679.92,1419.92 5720,1460 5720,1695 5690.08,1724.92 R207.2@5619.41,1724.92 5620,1725.51 v2(5620,1775)
  Bottom Layer w10: v2(4990,1783.31) 4990,1850 5225.59,2085.59 v2(5314.41,2085.59) 5449.41,2085.59 5620,1915 v2(5620,1775)
OUT7_P: C122.2 R162.2 R178.2 R195.2 R217.2 U31.6 | length 4397
  Top Layer w10: C122.2@4880,3865.26 4900.96,3865.26 4928.15,3838.07 4928.15,3728.06 6344.41,2311.8 U31.6@6344.41,2170 v2(6344.41,2090.59) ; R162.2@6019.41,1429.92 5975.08,1429.92 5925,1480 5925,1670 5994.52,1739.52 6019,1739.52 R178.2@6019.41,1739.92 6020,1740.51 v2(6020,1788.31) ; R195.2@6649.41,1424.92 6709.92,1424.92 6750,1465 6750,1700 6720.08,1729.92 R217.2@6649.41,1729.92 6650,1730.51 v2(6650,1780)
  Bottom Layer w10: v2(6020,1788.31) 6020,1855 6255.59,2090.59 v2(6344.41,2090.59) 6489.41,2090.59 6650,1930 v2(6650,1780)
OUT8_P: C137.2 R164.2 R180.2 R197.2 R220.2 U32.6 | length 4928.3
  Top Layer w10: C137.2@5230,3855.34 5250.96,3855.34 6049.12,3057.18 6549.02,3057.18 7339.41,2266.79 U32.6@7339.41,2180 v2(7339.41,2100.59) ; R164.2@7014.41,1439.92 6970.08,1439.92 6920,1490 6920,1680 6989.52,1749.52 7014,1749.52 R180.2@7014.41,1749.92 7015,1750.51 v2(7015,1798.31) ; R197.2@7644.41,1434.92 7704.92,1434.92 7745,1475 7745,1710 7715.08,1739.92 R220.2@7644.41,1739.92 7645,1740.51 v2(7645,1790)
  Bottom Layer w10: v2(7015,1798.31) 7015,1865 7250.59,2100.59 v2(7339.41,2100.59) 7469.41,2100.59 7645,1925 v2(7645,1790)
P18: J3.11
PS_ETH_LED0: R101.1 R116.1 U16.34 | length 1911.1
  Top Layer w8: R116.1@6109.53,4565 6114.53,4570 v2(6155,4570) 6155,4600.25 6239.63,4684.88 U16.34@6271.44,4684.88 ; v4(6145,4240) 6146.14,4238.86 6146.14,4228.86 6200,4175 7245.31,4175 7250,4179.69 7250.16,4179.69 7381.76,4311.28 7385.69,4311.28 7395.47,4321.06 R101.1@7395.47,4325
  Bottom Layer w8: v4(6145,4240) 6145,4560 v2(6155,4570)
PS_ETH_LED1: J12.11 R115.1 U16.35 | length 2317.1
  Top Layer w8: R115.1@6109.53,4516.67 6173.5,4516.67 6197,4540.17 6197,4622.46 6215.57,4641.03 6237,4641.03 6265.04,4669.07 U16.35@6280.53,4669.13 U16.35@6280.53,4669.13 ; v4(6170,4155) 6195,4130 7355.17,4130 7600,4374.83 J12.11@7600,4478.35
  Bottom Layer w8: 6115,4494.67 6115,4210 v4(6170,4155) ; 6115.03,4494.7 6115.03,4502.53 6127,4514.5 v2(6127,4516.67)
PS_N0: J12.3 U16.2 | length 662.5
  Top Layer w6: 6522.56,4666.33 6584.63,4666.33 6592.96,4658 6773.98,4658 6857.5,4574.48 7077.9,4574.48 7080.96,4571.42 7087.64,4571.42 7091.16,4574.94 7091.16,4579.91 J12.3@7057.09,4613.98
PS_N1: J12.7 U16.5 | length 643
  Top Layer w6: 6522.56,4716 6531.88,4716 6532.43,4715.44 6764.9,4715.44 6789.58,4690.77 7014.07,4690.77 7017.59,4694.28 7017.59,4774.48 J12.7@7057.09,4813.98
PS_N2: J12.6 U16.8 | length 667.1
  Top Layer w6: 6522.56,4763.62 6523.48,4763.62 6530.03,4757.07 6531.05,4757.07 6537.99,4764 6639.81,4764 6660.33,4743.49 6877.29,4743.49 6882.29,4748.49 v4(6885,4748.49)
  Bottom Layer w6: v4(6885,4748.49) 6887.71,4748.49 6892.71,4743.49 6976.58,4743.49 7003.51,4770.41 7094.49,4770.41 7101.52,4763.38 7156.5,4763.38 J12.6@7157.09,4763.98
PS_N3: J12.9 U16.11 | length 668.5
  Top Layer w6: U16.11@6509.47,4810.87 6523.49,4810.87 6592.59,4879.98 6841.1,4879.98 6849.65,4871.42 7087.64,4871.42 7091.16,4874.94 7091.16,4879.91 J12.9@7057.09,4913.98
PS_P0: J12.2 U16.1 | length 693.8
  Top Layer w6: U16.1@6511.25,4653.88 6512.38,4653.88 6515.93,4650.33 6578,4650.33 6586.33,4642 6767.35,4642 6850.87,4558.48 7071.28,4558.48 7074.33,4555.42 7094.27,4555.42 7107.21,4568.36 7152.7,4568.36 J12.2@7157.09,4563.98
PS_P1: J12.4 U16.4 | length 656
  Top Layer w6: 6522.56,4700 6525.25,4700 6525.8,4699.44 6646.74,4699.44 6647.3,4700 6757.72,4700 6782.95,4674.77 7020.7,4674.77 7028.08,4682.15 7033.05,4682.15 7051.23,4663.98 J12.4@7157.09,4663.98
PS_P2: J12.5 U16.7 | length 665.2
  Top Layer w6: U16.7@6514.08,4750.68 6519.44,4750.68 6525.06,4745.07 6536.03,4745.07 6542.96,4752 6634.84,4752 6655.36,4731.49 6877.29,4731.49 6882.29,4726.49 v4(6885,4726.49)
  Bottom Layer w6: v4(6885,4726.49) 6887.71,4726.49 6892.71,4731.49 6981.55,4731.49 7008.48,4758.41 7089.52,4758.41 7093.04,4754.9 7093.04,4749.93 J12.5@7057.09,4713.98
PS_P3: J12.8 U16.10 | length 683.7
  Top Layer w6: U16.10@6512.65,4795.12 6530.36,4795.12 6599.22,4863.98 6834.47,4863.98 6843.02,4855.42 7094.27,4855.42 7107.21,4868.36 7152.7,4868.36 J12.8@7157.09,4863.98
PULSE_24V_GND: D2.2 P1.1 U9.3 | length 483.9
  Top Layer w10: U9.3@5520,8373.07 5520,8382.91 5582.94,8445.85 D2.2@5582.94,8525 5585,8527.06 P1.1@5585,8830
PULSE_EXT_24V+: P1.3 R16.1 | length 310.2
  Top Layer w10: R16.1@5100.08,8555 5100.08,8555.79 5185,8640.71 P1.3@5185,8830
PULSE_OUT: D2.1 P1.2 R20.2 U9.4 | length 594.6
  Top Layer w10: R20.2@5284.92,8555 5365.67,8555 D2.1@5395.67,8525 ; P1.2@5385,8830 5385,8535.67 D2.1@5395.67,8525 ; U9.4@5420,8373.07 5395.67,8397.4 D2.1@5395.67,8525
R18: J3.7
RXD: U19.7 U20.3 | length 760.8
  Top Layer w6: U19.7@6315,3225 6315,3257 6412.5,3354.5 6837.5,3354.5 6935,3452 U20.3@6935,3480
RXD_1: J11.1 U19.2 | length 138.8
  Top Layer w6: U19.2@6315,3545 6315,3651.56 J11.1@6337.78,3674.34
T17: J3.9
T20: J1.33
TXD: U19.6 U20.2 | length 934.6
  Top Layer w6: U19.6@6265,3225 v2(6265,3305) ; v2(6980,3385) 6985,3390 U20.2@6985,3480
  Bottom Layer w6: v2(6265,3305) 6266,3306 6266,3322 6284,3340 6935,3340 v2(6980,3385)
TXD_1: J11.3 U19.3 | length 259.5
  Top Layer w6: U19.3@6265,3545 6265,3577 6295.25,3607.25 6295.25,3731.81 J11.3@6337.78,3774.34
U20: J1.35
V20: J1.29
VBIAS_1V5: R31.1 R38.1 R51.1 R64.1 R72.1 R87.1 R104.1 R112.1 R135.1 R139.1 R141.1 R148.1 R150.1 R151.1 R152.1 R154.1 R193.2 R204.2 R205.2 R208.1 R211.2 R212.2 R213.2 R221.2 R249.1 R255.1 R257.1 R259.1 R262.1 R264.1 R266.1 R268.1 U7.1 U7.4 | length 3258
  Top Layer w20: R151.1@254.41,1109.92 255.19,1109.92 300.28,1155 v2(330,1155) ; R268.1@569.41,1869.92 664.92,1869.92 v2(670,1875) ; R221.2@969.92,1320 969.92,1424.92 v2(985,1440) ; R154.1@1220,1104.92 1220.79,1104.92 1275,1159.13 v2(1275,1170) ; R262.1@1534.41,1864.92 1540.08,1864.92 1540.15,1864.85 1619.85,1864.85 v2(1620,1865) ; R211.2@1934.92,1315 1934.92,1434.92 v2(1950,1450) ; v2(1965,3880) R31.1@1965,3925.08 ; v2(2060,1170) 2060,1153.54 2103.66,1109.88 2104.45,1109.88 R148.1@2109.41,1104.92 ; v2(2320,3880.08) R38.1@2320,3925.16 ; R264.1@2499.41,1864.92 2595.08,1864.92 v2(2600,1860) ; v2(2675,3875) R51.1@2675,3920.08 ; R212.2@2899.92,1315 2899.92,1434.92 v2(2910,1445) ; v2(3010,1170) 3010,1130 3033.66,1106.34 3077.98,1106.34 R152.1@3079.41,1104.92 ; v2(3025.74,3873.62) R64.1@3025.74,3918.7 ; R266.1@3469.41,1864.92 3540.08,1864.92 v2(3555,1850) ; U7.1@3799.58,4672.4 3822.89,4672.4 3877.29,4618 3877.29,4597.95 3877.64,4597.6 U7.4@3890.42,4597.6 3890.42,4515.42 v2(3890,4515) ; R213.2@3869.92,1315 3869.92,1419.92 v2(3895,1445) ; v2(3910,3865) R72.1@3910,3910.08 ; v2(3990,1175) 3990,1174.13 4034.25,1129.88 4035.04,1129.88 R135.1@4040,1124.92 ; v2(4270,3865) R87.1@4270,3910.08 ; R255.1@4400,1870 v2(4475,1870) ; v2(4640,3865) R104.1@4640,3910.08 ; R204.2@4809.92,1310 4809.92,1315.67 4810,1315.75 4810,1430 v2(4820,1440) ; v2(4950,1170) 4950,1115 4965.08,1099.92 R139.1@4999.41,1099.92 ; v2(4985,3865) R112.1@4985,3910.08 ; R249.1@5389.41,1859.92 5389.49,1860 v2(5475,1860) ; R193.2@5789.92,1310 5789.92,1439.92 v2(5795,1445) ; v2(5965,1170) 5965,1168.54 6023.66,1109.88 6024.45,1109.88 R141.1@6029.41,1104.92 ; R257.1@6419.41,1864.92 6419.49,1865 v2(6495,1865) ; R205.2@6819.92,1315 6819.92,1399.92 v2(6865,1445) ; v2(6960,1170) 6968.54,1170 7018.66,1119.88 7019.45,1119.88 R150.1@7024.41,1114.92 ; R259.1@7414.41,1874.92 7419.37,1869.96 7420.15,1869.96 7448.44,1841.67 7536.67,1841.67 v2(7560,1865) ; v2(7787,1485) 7803.28,1485 7815,1473.28 7815,1330.75 7814.92,1330.67 R208.1@7814.92,1325
VBIAS_1V5_RAW: C31.2 C32.2 U6.1 U7.3 | length 245.4
  Top Layer w30: U6.1@3558.31,4607.6 3673.78,4607.6 3683.78,4597.6 U7.3@3799.58,4597.6
W20: J1.31
Y18: J1.25
Y19: J1.27
pads on no net: J1. J1.1@3594.45,7784.68 J2. J2.1@3593.94,6239.41 J3. J3.1@4539.33,7784.68 J4. J4.1@4538.82,6239.41 J5.6 J5.7 J5.8 SW2.1 SW2.4 SW2.5 U1.2 U1.4 U1.5 U1.6 U1.8 U1.9 U1.10 U1.11 U1.12 U1.17 U1.18 U1.19 U2.2 U2.4 U2.5 U2.6 U2.8 U2.9 U2.10 U2.11 U2.12 U2.17 U2.18 U2.19 U8.3 U8.5 U10.4 U12.8 U12.23 U12.24 U12.25 U12.26 U12.27 U12.30 U13.1 U16.12 U16.33 U16.46 U17.8 U17.23 U17.24 U17.25 U17.26 U17.27 U17.30 U20.7 U20.8 U20.9 U20.10 U20.11 U20.12 U20.13 U20.14 U20.15 U29.1 U29.5 U29.8 U30.1 U30.5 U30.8 U31.1 U31.5 U31.8 U32.1 U32.5 U32.8 U33.1 U33.5 U33.8 U34.1 U34.5 U34.8 U35.1 U35.5 U35.8 U36.1 U36.5 U36.8 U37.12 U38.12 U39.12 U40.12 U41.12 U42.12 U43.12 U44.12 USBC1.A8 USBC1.B8

## Polygon pours and split planes (outlines as drawn)
AGND on Top Layer "3" (solid, pour order 26): 0,4975 5530,4975 5530,2900 7874.02,2900 7874.02,0 0,0
GND on Top Layer "3" (solid, pour order 28): 0,4975 0,9055.12 7874.02,9055.12 7874.02,2900 5530,2900 5530,4975
NetP2_2 on Top Layer "NETP2_2_L01_P002" (solid, pour order 2): 730,8945 750,8925 750,8845 545,8640 545,8525 515,8495 350,8495 325,8520 325,8580 350,8605 440,8605 465,8630 465,8765 645,8945
NetF2_1 on Top Layer "NETF2_1_L01_P003" (solid, pour order 3): 705,8490 765,8430 765,8350 665,8350 625,8390 345,8390 335,8400 335,8490
24V on Top Layer "24V_L01_P005" (solid, pour order 5): 1560,8570 1600,8530 1600,8160 1540,8160 1520,8180 1520,8305 1457.5,8305 1450,8310 1440,8310 850,8310 850,8415 1005,8570
24V on Top Layer "24V_L01_P006" (solid, pour order 6): 850,8320 850,8025 950,8025 950,8250 1020,8320
24V on Top Layer "24V_L01_P007" (solid, pour order 7): 1165,8015 1165,8115 850,8115 850,8015
24V on Top Layer "24V_L01_P008" (solid, pour order 8): 850,8115 850,8030 665,7845 620,7845 445,7845 445,7765 735,7765 950,7980 950,8115
24V on Top Layer "24V_L01_P009" (solid, pour order 9): 470.29,7845 5,7845 5,4660 10,4665 145,4665 145,7765 475,7765
+12V_d on Top Layer "+12V_D_L01_P010" (solid, pour order 10): 1020,7300 1020,7215 535,7215 535,7140 230,7140 230,7235 360,7235 360,7300
-12V_d on Top Layer "-12V_D_L01_P011" (solid, pour order 11): 240,7020 590,7020 590,6935 1020,6935 1020,6855 220,6855 220,7020
NetC69_1 on Top Layer "NETC69_1_L01_P013" (solid, pour order 13): 435,4825 525,4825 525,4450 520,4445 435,4445
NetC69_1 on Top Layer "NETC69_1_L01_P014" (solid, pour order 14): 240,4905 525,4905 525,4670 520,4675 240,4675
NetC69_1 on Top Layer "3" (solid, pour order 15): 524.86,4458.14 530,4160 355,4160 355,4295 435,4295 435,4462.94
NetJACK1_1 on Top Layer "3" (solid, pour order 16): 795,6550 795,6545 795,6380 495,6380 495,6550
NetF1_1 on Top Layer "3" (solid, pour order 17): 995,6202.5 995,6115 627.5,6115 627.5,6202.5
DVDD10_PS on Top Layer "3" (solid, pour order 18): 6565,4630 6685,4630 6685,4440 6565,4440
ADVDD10_PS on Top Layer "3" (solid, pour order 21): 6680,4440 6680,4230.83 6610,4230.83 6610,4365 6570,4365 6570,4440
GND on Bottom Layer "3" (solid, pour order 29): 0,4975 0,9055.12 7874.02,9055.12 7874.02,2900 5530,2900 5530,4975
DVDD10_PS on Bottom Layer "3" (solid, pour order 19): 6195,4815 6230,4815 6230,4632.44 6675.06,4632.44 6675.06,4592.44 6632.93,4592.44 6195,4592.44
DVDD10_PS on Bottom Layer "3" (solid, pour order 20): 6620,4615 6620,4440 6675,4440 6675,4615
ADVDD10_PS on Bottom Layer "3" (solid, pour order 23): 6680,4325 6680.47,4325.47 6680.47,4396.65 6845,4396.65 6845,4735 6625,4735 6625,4805 6570,4805 6570,4650 6625,4650 6625,4685 6795,4685 6795,4425 6610,4425 6610,4311.22 6680,4311.22
ADVDD10_PS on Bottom Layer "3" (solid, pour order 24): 6610,4295 6681.65,4295 6681.65,4191.65 6681.65,4195 6675,4195 6200,4195 6180,4215 6165,4230 6165,4359.69 6215,4359.69 6215,4225 6610,4225
AGND on Bottom Layer "3" (solid, pour order 27): 0,4975 5530,4975 5530,2900 7874.02,2900 7874.02,0 0,0
+15V on POWER (split plane): 1804.91,3310.82 1804.91,3119.18 1795.82,3110.08 1595.09,3110.08 1595.09,3259.17 1594.74,3261.78 1593.74,3264.21 1592.13,3266.3 1591.3,3267.13 1589.21,3268.73 1586.78,3269.74 1584.17,3270.09 1434.18,3270.09 1402.13,3302.13 1400.04,3303.73 1397.61,3304.74 1395,3305.09 765,3305.09 762.39,3304.74 759.96,3303.73 757.87,3302.13 302.87,2847.13 301.27,2845.04 300.26,2842.61 299.91,2840 299.91,2654.18 67.87,2422.13 66.27,2420.04 65.26,2417.61 64.91,2415 64.91,1155 65.26,1152.39 66.27,1149.96 67.87,1147.87 287.87,927.87 289.96,926.27 290.67,925.97 292.39,925.26 295,924.91 534.41,924.91 534.41,920 539.41,915 634.41,915 654.41,895 814.41,895 829.41,910 829.41,924.91 1499.41,924.91 1499.41,915 1504.41,910 1599.41,910 1619.41,890 1779.41,890 1794.41,905 1794.41,924.91 2465.64,924.91 2465.64,913.77 2470.64,908.77 2565.64,908.77 2585.64,888.77 2745.64,888.77 2760.64,903.77 2760.64,924.91 3434.41,924.91 3434.41,915 3439.41,910 3534.41,910 3554.41,890 3714.41,890 3729.41,905 3729.41,924.91 4480.09,924.91 4495,910 4615,910 4615,924.91 5356.87,924.91 5356.87,907.54 5361.87,902.54 5456.87,902.54 5476.87,882.54 5636.87,882.54 5651.87,897.54 5651.87,924.91 6386.87,924.91 6386.87,912.54 6391.87,907.54 6486.87,907.54 6506.87,887.54 6666.87,887.54 6681.87,902.54 6681.87,924.91 7265.82,924.91 7289.91,900.82 7289.91,724.18 7235.82,670.09 4690,670.09 4687.39,669.74 4684.96,668.73 4682.87,667.13 4450.82,435.09 4385,435.09 4382.39,434.74 4381.68,434.45 4379.96,433.73 4377.87,432.13 4307.87,362.13 4306.27,360.04 4305.26,357.61 4304.91,355 4304.91,185 4304.91,20.1 20.1,20.1 20.1,2959.91 265,2959.91 267.61,2960.26 270.04,2961.26 272.13,2962.87 699.18,3389.91 1725.82,3389.91
-15V on POWER (split plane): 465,2979.91 1760.82,2979.91 1879.91,2860.82 1879.91,2584.18 1835.82,2540.09 1460.09,2540.09 1460.09,2820 1459.74,2822.61 1458.74,2825.04 1457.13,2827.13 1455.04,2828.74 1452.61,2829.74 1450,2830.09 1130,2830.09 1127.39,2829.74 1126.68,2829.45 1124.96,2828.74 1122.87,2827.13 895.82,2600.09 410,2600.09 407.39,2599.74 404.96,2598.74 402.87,2597.13 122.87,2317.13 121.27,2315.04 120.26,2312.61 119.91,2310 119.91,1260 120.26,1257.39 121.27,1254.96 122.87,1252.87 292.87,1082.87 294.96,1081.26 297.39,1080.26 300,1079.91 7853.92,1079.91 7853.92,20.1 4325.09,20.1 4325.09,185 4325.09,350.82 4389.18,414.91 4455,414.91 4457.61,415.26 4460.04,416.27 4462.13,417.87 4694.18,649.91 7240,649.91 7242.61,650.26 7245.04,651.27 7247.13,652.87 7307.13,712.87 7308.74,714.96 7309.74,717.39 7310.09,720 7310.09,905 7309.74,907.61 7308.74,910.04 7307.13,912.13 7277.13,942.13 7275.04,943.73 7272.61,944.74 7270,945.09 6681.87,945.09 6681.87,962.54 6386.87,962.54 6386.87,945.09 5651.87,945.09 5651.87,957.54 5356.87,957.54 5356.87,945.09 4615,945.09 4615,985 4375,985 4375,945.09 3729.41,945.09 3729.41,965 3434.41,965 3434.41,945.09 2760.64,945.09 2760.64,963.77 2465.64,963.77 2465.64,945.09 1794.41,945.09 1794.41,965 1499.41,965 1499.41,945.09 829.41,945.09 829.41,970 534.41,970 534.41,945.09 299.18,945.09 85.09,1159.18 85.09,2410.82 317.13,2642.87 318.73,2644.96 319.03,2645.67 319.74,2647.39 320.09,2650 320.09,2835.82 464.27,2980.01
+12V_d on POWER (split plane): 1334.91,7440.82 1334.91,6570 1335.24,6567.5 1334.91,6565 1335.26,6562.39 1336.26,6559.96 1337.87,6557.87 1339.96,6556.26 1342.39,6555.26 1345,6554.91 2180,6554.91 4674.91,6554.91 4674.91,6334.18 4555.82,6215.09 1365,6215.09 1362.39,6214.74 1359.96,6213.73 1357.87,6212.13 1207.87,6062.13 1206.26,6060.04 1205.26,6057.61 1204.91,6055 1204.91,5845 1204.91,5484.18 1170.82,5450.09 20.1,5450.09 20.1,7509.91 390,7509.91 392.61,7510.26 395.04,7511.26 397.13,7512.87 414.18,7529.91 1245.82,7529.91
+12V on POWER (split plane): 280 vertices, not listed, extent 20.1,1285.09 7754.91,5465.74
IOVDD on POWER (split plane): 165 vertices, not listed, extent 20.1,3040.35 7853.92,9035.02
-12V on POWER (split plane): 510 vertices, not listed, extent 140.09,1198.9 7754.91,2809.91
VBIAS_1V5 on POWER (split plane): 377 vertices, not listed, extent 224.35,1100.09 7853.92,4624.91
AVDD on POWER (split plane): 1682.87,4957.87 1802.87,4837.87 1804.96,4836.26 1807.39,4835.26 1810,4834.91 2525,4834.91 2527.61,4835.26 2530.04,4836.27 2532.13,4837.87 2599.18,4904.91 2930.82,4904.91 3112.87,4722.87 3114.96,4721.27 3117.39,4720.26 3120,4719.91 4330,4719.91 4332.61,4720.26 4335.04,4721.27 4337.13,4722.87 4569.18,4954.91 4905.82,4954.91 4934.91,4925.82 4934.91,4639.18 4906.32,4610.59 4834.78,4610.59 4803.23,4642.13 4801.14,4643.73 4798.71,4644.74 4796.1,4645.09 2205,4645.09 2202.39,4644.74 2199.96,4643.73 2197.87,4642.13 2045.82,4490.09 1619.18,4490.09 1600.09,4509.18 1600.09,4875.82 1682.55,4958.28
1V8 on POWER (split plane): 5875.37,6175.37 6834.91,5215.82 6834.91,4954.18 6760.82,4880.09 6615,4880.09 6612.39,4879.74 6611.17,4879.24 6609.96,4878.73 6607.87,4877.13 6560.82,4830.09 6145.5,4830.09 6142.89,4829.74 6140.46,4828.73 6138.37,4827.13 6101.32,4790.09 5989.18,4790.09 5960.09,4819.18 5960.09,4915.82 6004.18,4959.91 6145,4959.91 6147.61,4960.26 6150.04,4961.27 6152.13,4962.87 6217.13,5027.87 6218.73,5029.96 6219.24,5031.17 6219.74,5032.39 6220.09,5035 6220.09,5095 6219.74,5097.61 6219.03,5099.33 6218.73,5100.04 6217.13,5102.13 5892.13,5427.13 5417.13,5902.13 5415.04,5903.73 5412.61,5904.74 5410,5905.09 1360.09,5905.09 1360.09,5985.82 1444.18,6069.91 4680,6069.91 4682.61,6070.26 4685.04,6071.27 4687.13,6072.87 4791.7,6177.43 5873.78,6177.43
+5 on POWER (split plane): 7419.91,7150.82 7419.91,6914.18 7162.87,6657.13 6703.34,6197.61 4787.52,6197.61 4784.91,6197.26 4783.19,6196.55 4782.48,6196.25 4780.39,6194.65 4675.82,6090.09 1440,6090.09 1437.39,6089.74 1434.96,6088.73 1432.87,6087.13 1342.87,5997.13 1341.26,5995.04 1340.26,5992.61 1339.91,5990 1339.91,5755 1340.26,5752.39 1341.26,5749.96 1342.87,5747.87 2067.87,5022.87 2069.96,5021.27 2072.39,5020.26 2075,5019.91 3135.82,5019.91 3277.87,4877.87 3279.96,4876.27 3282.39,4875.26 3285,4874.91 3287.5,4875.24 3290,4874.91 4000.82,4874.91 4079.91,4795.82 4079.91,4740.09 3124.18,4740.09 2942.13,4922.13 2940.04,4923.73 2937.61,4924.74 2935,4925.09 2595,4925.09 2592.39,4924.74 2591.68,4924.45 2589.96,4923.73 2587.87,4922.13 2520.82,4855.09 1814.18,4855.09 1697.13,4972.13 1695.04,4973.73 1694.93,4973.78 1695.09,4975 1695.09,5010 1694.74,5012.61 1694.03,5014.33 1693.74,5015.04 1692.13,5017.13 1225.09,5484.18 1225.09,5845 1225.09,6050.82 1369.18,6194.91 4560,6194.91 4562.61,6195.26 4565.04,6196.27 4567.13,6197.87 4692.13,6322.87 4693.73,6324.96 4694.74,6327.39 4695.09,6330 4695.09,6555 4694.74,6557.61 4693.73,6560.04 4692.13,6562.13 4690.04,6563.73 4687.61,6564.74 4685.08,6565.08 4684.74,6567.61 4683.73,6570.04 4682.13,6572.13 4680.04,6573.73 4677.61,6574.74 4675,6575.09 2180,6575.09 1355.09,6575.09 1355.09,6979.91 6470,6979.91 6472.61,6980.26 6475.04,6981.27 6477.13,6982.87 6839.18,7344.91 7225.82,7344.91
GND on GND (split plane): 7853.92,2905.1 5535.1,2905.1 5535.1,4975 5534.71,4976.95 5533.6,4978.6 5531.95,4979.71 5530,4980.1 20.1,4980.1 20.1,9035.02 7853.92,9035.02
AGND on GND (split plane): 5524.9,2900 5525.29,2898.05 5526.4,2896.4 5528.05,2895.29 5530,2894.9 7853.92,2894.9 7853.92,20.1 20.1,20.1 20.1,4969.9 5524.9,4969.9

## Other copper
Top Layer:
  pour cut-out: 7262.48,2015.93 7262.57,2015.84 7319.15,2015.84 7319.15,1899.3 7326.04,1892.41 7326.04,1772.76 7270.65,1772.76 7262.48,1780.93
  pour cut-out: 6267.48,2005.93 6267.57,2005.84 6324.15,2005.84 6324.15,1889.3 6331.04,1882.41 6331.04,1762.76 6275.65,1762.76 6267.48,1770.93
  pour cut-out: 5237.48,2000.93 5237.57,2000.84 5294.15,2000.84 5294.15,1884.3 5301.04,1877.41 5301.04,1757.76 5245.65,1757.76 5237.48,1765.93
  pour cut-out: 4243.07,2005.93 4243.17,2005.84 4299.75,2005.84 4299.75,1889.3 4306.63,1882.41 4306.63,1762.76 4251.25,1762.76 4243.07,1770.93
  pour cut-out: 3317.48,2005.93 3317.57,2005.84 3374.15,2005.84 3374.15,1889.3 3381.04,1882.41 3381.04,1762.76 3325.65,1762.76 3317.48,1770.93
  pour cut-out: 2338.07,1995.93 2338.17,1995.84 2394.75,1995.84 2394.75,1879.3 2401.63,1872.41 2401.63,1752.76 2346.25,1752.76 2338.07,1760.93
  pour cut-out: 1373.07,2010.93 1373.17,2010.84 1429.75,2010.84 1429.75,1894.3 1436.63,1887.41 1436.63,1767.76 1381.25,1767.76 1373.07,1775.93
  pour cut-out: 408.07,2005.93 408.17,2005.84 464.75,2005.84 464.75,1889.3 471.63,1882.41 471.63,1762.76 416.25,1762.76 408.07,1770.93
  pour cut-out: 4375,985 4375,935 4380,930 4475,930 4495,910 4615,910 4615,985
  pour cut-out: 7379.41,975 7379.41,925 7384.41,920 7479.41,920 7499.41,900 7659.41,900 7674.41,915 7674.41,975
  pour cut-out: 6385.64,963.77 6385.64,913.77 6390.64,908.77 6485.64,908.77 6505.64,888.77 6665.64,888.77 6680.64,903.77 6680.64,963.77
  pour cut-out: 5354.41,960 5354.41,910 5359.41,905 5454.41,905 5474.41,885 5634.41,885 5649.41,900 5649.41,960
  pour cut-out: 3434.41,965 3434.41,915 3439.41,910 3534.41,910 3554.41,890 3714.41,890 3729.41,905 3729.41,965
  pour cut-out: 2466.87,962.54 2466.87,912.54 2471.87,907.54 2566.87,907.54 2586.87,887.54 2746.87,887.54 2761.87,902.54 2761.87,962.54
  pour cut-out: 1499.41,965 1499.41,915 1504.41,910 1599.41,910 1619.41,890 1779.41,890 1794.41,905 1794.41,965
  pour cut-out: 534.41,970 534.41,920 539.41,915 634.41,915 654.41,895 814.41,895 829.41,910 829.41,970